# Altium PCB BUCK-BOOST_PWM_Controller.PcbDoc (part 1 of 2)
Units mil, origin at the board's own origin, x right, y up, seen from the top; angles counter-clockwise.
Board outline 3547.43 x 2765.94 mil, 2 copper layers (Top Layer, Bottom Layer); 199 components, 100 nets, 475 pads, 71 vias.
Unrouted connection lines stored in the file: 456.
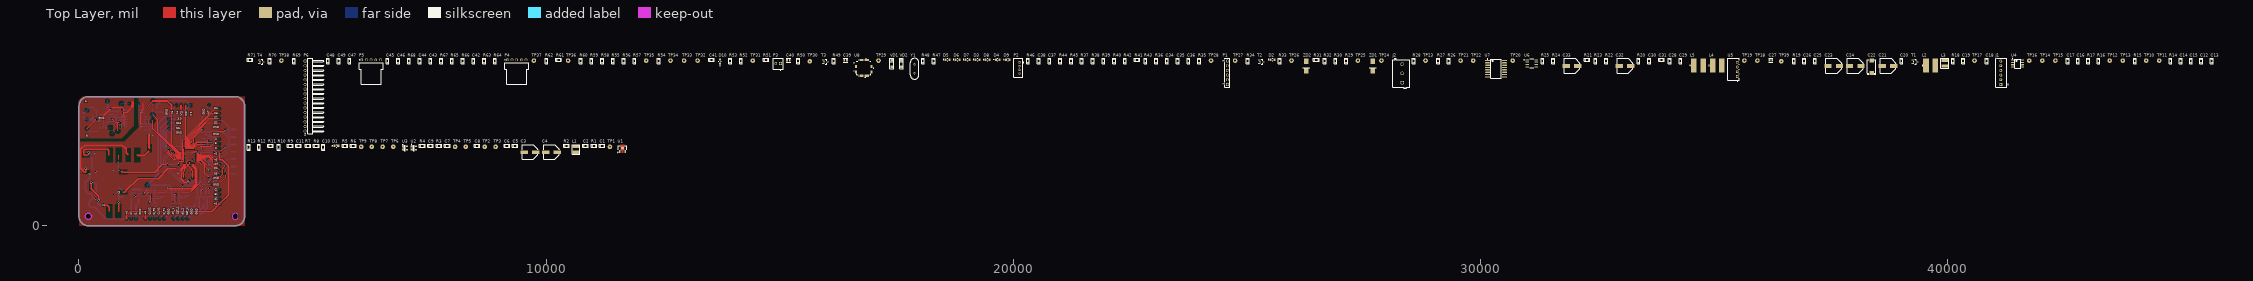
[diagram p0: Top Layer view]
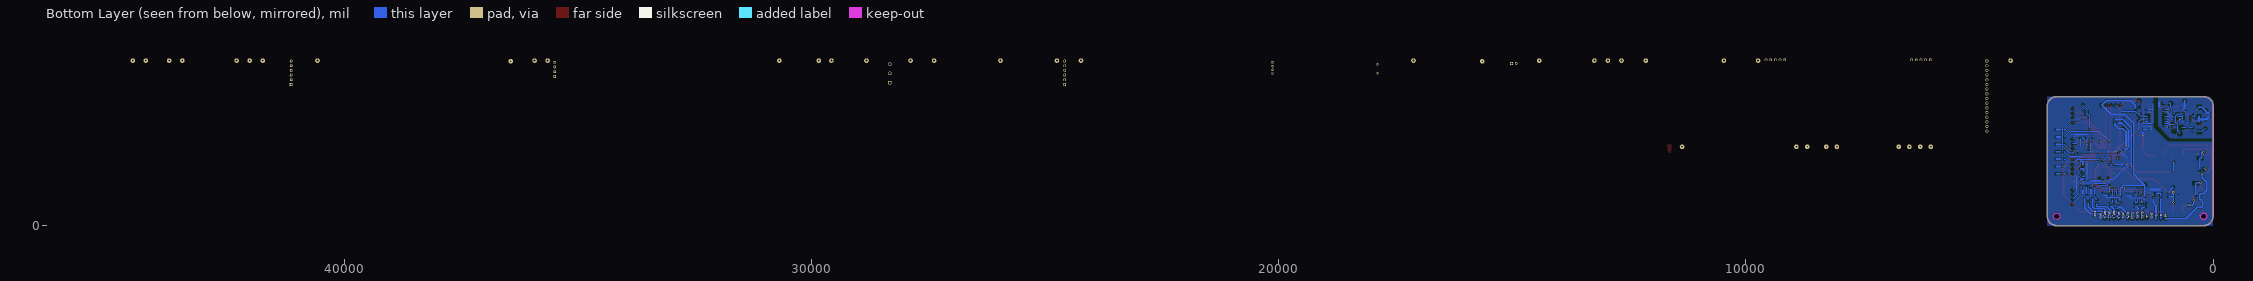
[diagram p1: Bottom Layer view, seen from below]

## Layer stack, top to bottom
Top Solder: solder mask 0.4, Solder Resist, Dk 3.5
Top Layer: signal copper 1.4
Dielectric 1: dielectric 12.6, FR-4, Dk 4.8
Bottom Layer: signal copper 1.4
Bottom Solder: solder mask 0.4, Solder Resist, Dk 3.5

## Board outline
0.89,202.76 0.89,2564.86 0.89,2570.87 1.01,2571.96 cw(c202.76,2564.96) 202.76,2766.83 3346.46,2766.83 3346.51,2766.83 cw(c3346.46,2564.96) 3548.2,2571.97 3548.32,2570.87 3548.32,202.76 cw(c3346.46,202.76) 3346.5,0.89 3346.46,0.89 202.76,0.89 202.68,0.89 cw(c202.76,202.76)
cut-out: 3278.86,202.76 ccw(c3346.46,202.76) 3346.46,135.16 ccw(c3346.46,202.76) 3414.06,202.76 ccw(c3346.46,202.76) 3346.46,270.35 ccw(c3346.46,202.76)
cut-out: 202.76,135.16 cw(c202.76,202.76) 135.16,202.76 cw(c202.76,202.76) 202.76,270.35 cw(c202.76,202.76) 270.35,202.76 cw(c202.76,202.76)

## Design rules (kind name [scope] priority, off if disabled: settings)
Clearance [All] p1: gap=5.91 ignorepadtopadclearanceinfootprint=FALSE except(0: Via-Hole Fill-Hole Poly-Hole Region-Hole Text-Hole; 7.87: THPad-THPad THPad-Via THPad-Fill THPad-Poly THPad-Region THPad-Text THPad-Hole; 10: Via-Via Via-Fill Via-Poly Via-Region Via-Text Fill-Fill Fill-Poly Fill-Region Fill-Text Poly-Poly Poly-Region Poly-Text Region-Region Region-Text Text-Text)
DiffPairsRouting [All] p1: maxlimit=10 minlimit=7.87 mostfreqgap=10 toplayer_minwidth=15 toplayer_maxwidth=15 toplayer_prefwidth=15 bottomlayer_minwidth=15 bottomlayer_maxwidth=15 bottomlayer_prefwidth=15 maxuncoupledlength=500
PlaneClearance [All] p1: clearance=25
PlaneConnect [InNet('GND_2')] p1: planeconnectstyle=Direct reliefexpansion=20 reliefentries=4 reliefconductorwidth=10 reliefairgap=10
PolygonConnect [InNet('GND_III') vs InNet('GND_III')] p1: connectstyle=Direct reliefconductorwidth=10 reliefentries=4 polygonreliefangle="90 Angle" airgapwidth=10
RoutingVias [All] p1: holewidth=28 width=50 viastyle="Through Hole" minholewidth=28 minwidth=50 maxholewidth=28 maxwidth=50
SolderMaskExpansion [All] p1: expansion=4 istentingtop=FALSE
SupplyNets "Schematic Supply Nets_10" [InNet('GND_III')] p1: voltage=0.000
SupplyNets "Schematic Supply Nets_9" [InNet('+3V3_MCU')] p2: voltage=0.000
SupplyNets "Schematic Supply Nets_8" [InNet('+5V_ISO')] p3: voltage=0.000
SupplyNets "Schematic Supply Nets_7" [InNet('+5VDC')] p4: voltage=0.000
SupplyNets "Schematic Supply Nets_6" [InNet('+3V3_REF')] p5: voltage=0.000
SupplyNets "Schematic Supply Nets_5" [InNet('+5V_OUT')] p6: voltage=0.000
SupplyNets "Schematic Supply Nets_3" [InNet('GND_2')] p7: voltage=0.000
SupplyNets "Schematic Supply Nets_2" [InNet('+5V')] p8: voltage=0.000
SupplyNets "Schematic Supply Nets_1" [InNet('+3V3')] p9: voltage=0.000
SupplyNets "Schematic Supply Nets" [InNet('+5')] p10: voltage=0.000
Width [All] p1: maxlimit=196.85 minlimit=7.87 preferedwidth=10
27 further rules are at their usual default settings.

## Components (designator, comment, footprint, x,y, rotation, side; value= is the part's Value field where it differs from the comment)
C1 "0.1uF" CAP-0805 11198.41,1712.73 r0 top
C2 "0.1uF" CAP-0805 10843.08,1712.73 r0 top
C3 "CAP-POLAR" CAP_SMD_Size_E 9653.06,1577.88 r0 top
C4 "CAP-POLAR" CAP_SMD_Size_E 10113.71,1577.88 r0 top
C5 "0.1uF" CAP-0805 9336.11,1712.73 r0 top
C6 "0.1uF" CAP-0805 9157.96,1712.73 r0 top
C7 "0.1uF" CAP-0805 7882.3,1712.73 r0 top
C8 "0.1uF" CAP-0805 8520.13,1712.73 r0 top
C9 "0.1uF" CAP-0805 7526.97,1712.73 r0 top
C10 "0.1uF" CAP-0805 5228.63,1682.22 r90 top
C11 "0.1uF" CAP-0805 4702.03,1712.73 r0 top
C12 "1000pF" CAP-0805 45424.49,3526.8 r90 top
C13 "1000pF" CAP-0805 45644.97,3526.8 r90 top
C14 "1000pF" CAP-0805 44983.52,3526.8 r90 top
C15 "1000pF" CAP-0805 45204.01,3526.8 r90 top
C16 "0.1uF" CAP-0805 42782.63,3526.8 r90 top
C17 "0.1uF" CAP-0805 42562.15,3526.8 r90 top
C18 "0.1uF" CAP-0805 40830.76,3526.8 r90 top
C19 "0.1uF" CAP-0805 40330.74,3526.8 r90 top
C20 "0.1uF" CAP-0805 39005.87,3526.8 r90 top
C21 "CAP-POLAR" CAP_SMD_Size_E 38714.52,3422.46 r0 top
C22 "CAP-POLAR" CAP-TAN-D 38367.06,3406.71 r90 top
C23 "CAP-POLAR" CAP_SMD_Size_E 37555.01,3422.46 r0 top
C24 "CAP-POLAR" CAP_SMD_Size_E 38015.66,3422.46 r0 top
C25 "0.1uF" CAP-0805 37155.39,3526.8 r90 top
C26 "0.1uF" CAP-0805 36925.06,3526.8 r90 top
C27 "C0805C224K5RACTU" FP-C0805C-DN-MFG 36210.46,3543.53 r0 top value="0.22 μF"
C28 "0.1uF" CAP-0805 34047.95,3526.8 r90 top
C29 "0.1uF" CAP-0805 34278.28,3526.8 r90 top
C30 "0.1uF" CAP-0805 33607.97,3526.8 r90 top
C31 "0.1uF" CAP-0805 33867.82,3556.32 r0 top
C32 "CAP-POLAR" CAP_SMD_Size_E 33085.31,3422.46 r0 top
C33 "CAP-POLAR" CAP_SMD_Size_E 31954.34,3422.46 r0 top
C34 "0.1uF" CAP-0805 23288.57,3526.8 r90 top
C35 "0.1uF" CAP-0805 23518.89,3526.8 r90 top
C36 "0.1uF" CAP-0805 23749.22,3526.8 r90 top
C37 "0.1uF" CAP-0805 20774.67,3526.8 r90 top
C38 "0.1uF" CAP-0805 20544.34,3526.8 r90 top
C39 "16pF" FP-GRM21B-0_1-IPC_C 16407.33,3543.53 r0 top
C40 "16pF" FP-GRM21B-0_1-IPC_C 15185.81,3543.53 r0 top
C41 "0.1uF" CAP-0805 13541.04,3556.32 r0 top
C42 "220pF" CAP-0805 8446.31,3526.8 r90 top
C43 "220pF" CAP-0805 7524.02,3526.8 r90 top
C44 "22pF" CAP-0805 7293.69,3526.8 r90 top
C45 "22pF" CAP-0805 6602.71,3526.8 r90 top
C46 "22pF" CAP-0805 6833.04,3526.8 r90 top
C47 "330pF" CAP-0805 5791.65,3526.8 r90 top
C48 "330pF" CAP-0805 5331,3526.8 r90 top
C49 "330pF" CAP-0805 5561.32,3526.8 r90 top
D1 "151031YS06000" LED_GREEN 5509.16,1711.75 r0 top
D2 "LED" LED_BLUE 25547.54,3555.34 r0 top
D3 "151031YS06000" LED_BLUE 19233.25,3555.34 r0 top
D4 "151031YS06000" LED_BLUE 19664.37,3555.34 r0 top
D5 "151031YS06000" LED_RED 18587.55,3555.34 r0 top
D6 "151031YS06000" LED_YELLOW 18803.11,3555.34 r0 top
D7 "151031YS06000" LED_GREEN 19017.69,3555.34 r0 top
D8 "151031YS06000" LED_BLUE 19448.81,3555.34 r0 top
D9 "151031YS06000" LED_BLUE 19879.94,3555.34 r0 top
D10 "151031YS06000" LED_RED 13722.16,3519.91 r90 top
J1 "SWR25X-NRTC-S06-ST-BA" Sullins_SWR25X-NRTC-S06-ST-BA_MFG 41144.75,3275.8 r90 top
J2 "" 691101710003 28300.62,3263 r90 top
L1 "Coil" NR4030 10639.33,1634.97 r0 top
L2 "1000µH, 0.3A" WE-PD2_7850 39629.92,3433.29 r0 top
L3 "Coil" NR4030 39936.03,3479.55 r0 top
L4 "1000µH, 0.3A" WE-PD2_7850 35062.76,3433.29 r0 top
L5 "1000µH, 0.3A" WE-PD2_7850 34661.17,3433.29 r0 top
P1 "61300611121" 61300611121 24578.98,3275.8 r90 top
P2 "62000411622" 62000411622 20106.33,3379.15 r90 top
P3 "61900211121" 61900211121 14964.34,3464.78 r0 top
P4 "61900511021" 61900511021 9368.6,3259.07 r0 top
P5 "61900511021" 61900511021 6253.29,3259.07 r0 top
P6 "61301611021" 61301611021 4952.04,2775.77 r90 top
R1 "220" RES-0805 11021.24,1712.73 r0 top
R2 "470" RES-0805 10434.59,1712.73 r0 top
R3 "10K" RES-0805 7705.13,1712.73 r0 top
R4 "10K" RES-0805 7348.81,1712.73 r0 top
R5 "10K" RES-0805 5694.2,1712.73 r0 top
R6 "10K" RES-0805 5872.36,1712.73 r0 top
R7 "10K" RES-0805 4902.83,1712.73 r0 top
R8 "10K" RES-0805 5080,1712.73 r0 top
R9 "10K" RES-0805 4523.87,1712.73 r0 top
R10 "10K" RES-0805 4273.86,1682.22 r90 top
R11 "1K" RES-0805 4103.58,1712.73 r0 top
R12 "100K*" RES-0805 3853.56,1682.22 r90 top
R13 "100K*" RES-0805 3633.08,1682.22 r90 top
R14 "10K" RES-0805 44763.04,3526.8 r90 top
R15 "10K" RES-0805 44003.16,3526.8 r90 top
R16 "10K" RES-0805 43222.61,3526.8 r90 top
R17 "10K" RES-0805 43002.13,3526.8 r90 top
R18 "1K" RES-0805 40110.25,3526.8 r90 top
R19 "10K" RES-0805 36704.58,3526.8 r90 top
R20 "10K" RES-0805 33377.64,3526.8 r90 top
R21 "10K" RES-0805 32275.23,3556.32 r0 top
R22 "10K" RES-0805 32686.66,3526.8 r90 top
R23 "10K" RES-0805 32456.34,3526.8 r90 top
R24 "10K" RES-0805 31554.72,3526.8 r90 top
R25 "470" RES-0805 31324.39,3526.8 r90 top
R26 "100" RES-0805 29320.36,3526.8 r90 top
R27 "100" RES-0805 29090.03,3526.8 r90 top
R28 "1K" RES-0805 28570.32,3526.8 r90 top
R29 "10K" RES-0805 27123.4,3526.8 r90 top
R30 "220" RES-0805 26893.07,3526.8 r90 top
R31 "10K" RES-0805 26482.62,3556.32 r0 top
R32 "10K" RES-0805 26662.75,3526.8 r90 top
R33 "1K" RES-0805 25702.07,3526.8 r90 top
R34 "10K" RES-0805 25015.03,3526.8 r90 top
R35 "10K" RES-0805 23979.55,3526.8 r90 top
R36 "470" RES-0805 23058.24,3526.8 r90 top
R37 "220" RES-0805 21465.64,3526.8 r90 top
R38 "220" RES-0805 21695.97,3526.8 r90 top
R39 "220" RES-0805 21926.3,3526.8 r90 top
R40 "220" RES-0805 22156.62,3526.8 r90 top
R41 "220" RES-0805 22647.79,3556.32 r0 top
R42 "220" RES-0805 22386.95,3526.8 r90 top
R43 "220" RES-0805 22827.91,3526.8 r90 top
R44 "10K" RES-0805 21004.99,3526.8 r90 top
R45 "10K" RES-0805 21235.32,3526.8 r90 top
R46 "1K" RES-0805 20314.01,3526.8 r90 top
R47 "10E" RES-0805 18296.2,3526.8 r90 top
R48 "10E" RES-0805 18065.87,3526.8 r90 top
R49 "1K" RES-0805 16155.35,3526.8 r90 top
R50 "10K" RES-0805 15393.5,3526.8 r90 top
R51 "1K" RES-0805 14702.52,3556.32 r0 top
R52 "10K" RES-0805 14171.98,3526.8 r90 top
R53 "100" RES-0805 13941.65,3526.8 r90 top
R54 "10K" RES-0805 12411.07,3526.8 r90 top
R55 "220K" RES-0805 11429.72,3526.8 r90 top
R56 "220K" RES-0805 11660.05,3526.8 r90 top
R57 "220K" RES-0805 11890.37,3526.8 r90 top
R58 "100" RES-0805 11199.39,3526.8 r90 top
R59 "20K" RES-0805 10969.07,3526.8 r90 top
R60 "10K" RES-0805 10738.74,3526.8 r90 top
R61 "220" RES-0805 10268.25,3556.32 r0 top
R62 "100" RES-0805 10008.39,3526.8 r90 top
R63 "22K" RES-0805 8676.63,3526.8 r90 top
R64 "22K" RES-0805 8906.96,3526.8 r90 top
R65 "220K" RES-0805 7985.66,3526.8 r90 top
R66 "220K" RES-0805 8215.98,3526.8 r90 top
R67 "220K" RES-0805 7755.33,3526.8 r90 top
R68 "470" RES-0805 7063.37,3526.8 r90 top
R69 "1K" RES-0805 4604.58,3526.8 r90 top
R70 "1K" RES-0805 4084.87,3526.8 r90 top
R71 "10K" RES-0805 3662.61,3556.32 r0 top
T1 "BC847C" SOT23-3_IPC_A 39298.21,3510.06 r0 top
T2 "BC847C" SOT23-3_IPC_A 25307.37,3510.06 r0 top
T3 "BC847C" SOT23-3_IPC_A 15976.2,3510.06 r0 top
T4 "BC847C" SOT23-3_IPC_A 3904.75,3510.06 r0 top
TP1 "Test_Point_PCB" Test_Point 11365.74,1692.06 r0 top
TP2 "Test_Point_PCB" Test_Point 8688.45,1692.06 r0 top
TP3 "Test_Point_PCB" Test_Point 8917.79,1692.06 r0 top
TP4 "Test_Point_PCB" Test_Point 8050.62,1692.06 r0 top
TP5 "Test_Point_PCB" Test_Point 8279.96,1692.06 r0 top
TP6 "Test_Point_PCB" Test_Point 6729.69,1692.06 r0 top
TP7 "Test_Point_PCB" Test_Point 6499.36,1692.06 r0 top
TP8 "Test_Point_PCB" Test_Point 6269.04,1692.06 r0 top
TP9 "Test_Point_PCB" Test_Point 6039.69,1692.06 r0 top
TP10 "Test_Point_PCB" Test_Point 44243.33,3536.64 r90 top
TP11 "Test_Point_PCB" Test_Point 44522.87,3536.64 r90 top
TP12 "Test_Point_PCB" Test_Point 43462.78,3536.64 r90 top
TP13 "Test_Point_PCB" Test_Point 43743.31,3536.64 r90 top
TP14 "Test_Point_PCB" Test_Point 42021.76,3536.64 r90 top
TP15 "Test_Point_PCB" Test_Point 42301.31,3536.64 r90 top
TP16 "Test_Point_PCB" Test_Point 41741.24,3536.64 r90 top
TP17 "Test_Point_PCB" Test_Point 40569.92,3536.64 r90 top
TP18 "Test_Point_PCB" Test_Point 35924.03,3536.64 r90 top
TP19 "" Test_Point 35644.49,3536.64 r90 top
TP20 "Test_Point_PCB" Test_Point 30686.57,3536.64 r90 top
TP21 "Test_Point_PCB" Test_Point 29570.37,3536.64 r90 top
TP22 "Test_Point_PCB" Test_Point 29841.05,3536.64 r90 top
TP23 "Test_Point_PCB" Test_Point 28820.33,3536.64 r90 top
TP24 "Test_Point_PCB" Test_Point 27877.37,3536.64 r90 top
TP25 "" Test_Point 27373.41,3536.64 r90 top
TP26 "Test_Point_PCB" Test_Point 25952.08,3536.64 r90 top
TP27 "Test_Point_PCB" Test_Point 24744.35,3536.64 r90 top
TP28 "Test_Point_PCB" Test_Point 24229.56,3536.64 r90 top
TP29 "Test_Point_PCB" Test_Point 17113.07,3536.64 r90 top
TP30 "Test_Point_PCB" Pin_Test_Point(Pink) 15643.51,3519.91 r0 top
TP31 "Test_Point_PCB" Test_Point 14421.99,3536.64 r90 top
TP32 "Test_Point_PCB" Test_Point 13240.83,3536.64 r90 top
TP33 "Test_Point_PCB" Test_Point 12951.45,3536.64 r90 top
TP34 "Test_Point_PCB" Test_Point 12661.08,3536.64 r90 top
TP35 "Test_Point_PCB" Test_Point 12140.39,3536.64 r90 top
TP36 "Test_Point_PCB" Test_Point 10469.04,3536.64 r90 top
TP37 "Test_Point_PCB" Test_Point 9737.71,3536.64 r90 top
TP38 "Test_Point_PCB" Test_Point 4333.9,3536.64 r90 top
TP39 "Test_Point_PCB" Pin_Test_Point(Orange) 36433.89,3519.91 r0 top
U1 "AMS1117" SOT-89 11634.46,1663.52 r0 top
U2 "" SOT-23-5 7165.73,1664.5 r0 top
U3 "" SOT-23-5 6975.76,1664.5 r0 top
U4 "LP2951ACM-3.3" D0008A_N 41491.23,3471.67 r0 top
U5 "B0505S-1W" B0505S-1W 35410.22,3348.64 r90 top
U6 "MAX485" SOIC-8-MFG 31096.03,3477.58 r0 top
U7 "ADUM1401BRWZ" ADI-RW-16_M 30330.25,3362.42 r0 top
U8 "STM32F303CCT6" LQFP48-7x7mm 16798.09,3380.13 r0 top
VD1 "SMF3.3A" SMF3.3A 17394.58,3475.61 r0 top
VD2 "SMF3.3A" SMF3.3A 17604.23,3475.61 r0 top
Y1 "FOXSLF/120-20" FOX-FOXSLF-2_V 17885.74,3361.43 r90 top
ZD1 "P6SMB16CA" DO-214AA 27693.31,3331.9 r90 top
ZD2 "P6SMB16CA" DO-214AA 26271,3331.9 r90 top

## Footprints (in the part's own frame and the unit in brackets; to place one, negate y for a bottom-side part, rotate by r counter-clockwise, add the part's x,y. Pads: shape width x height; smd on the part's side, far side on the other; paste and mask are expansions set on the pad)
61300611121 [mm] "Pin Header, pitch 2.54 mm, THT, Vertical, single row, 6p"
  rrect50% 1.6x1.6 hole 1.1: 1(-6.35,0)
  round 1.6 hole 1.1: 2(-3.81,0) 3(-1.27,0) 4(1.27,0) 5(3.81,0) 6(6.35,0)
  silkscreen extent -7.77,-1.35 7.77,1.35, body extent -7.62,-1.27 7.62,1.27, height 8.57
61301611021 [mm] "Pin Header, pitch 2.54 mm, THT, Angled, single row, 16p"
  rrect50% 1.65x1.65 hole 1.1: 1(19.05,2.77)
  round 1.65 hole 1.1: 2(16.51,2.77) 3(13.97,2.77) 4(11.43,2.77) 5(8.89,2.77) 6(6.35,2.77) 7(3.81,2.77) 8(1.27,2.77) 9(-1.27,2.77) 10(-3.81,2.77) 11(-6.35,2.77) 12(-8.89,2.77) 13(-11.43,2.77) 14(-13.97,2.77) 15(-16.51,2.77) 16(-19.05,2.77)
  silkscreen extent -20.47,-7.27 20.47,1.35, body extent -20.32,-7.27 20.32,3.09, height 2.58
61900211121 [mm] "2.54mm Male Locking Header, 2p"
  rect 1.5x1.5 hole 1: 1(1.27,0.3)
  round 1.5 hole 1: 2(-1.27,0.3)
  silkscreen extent -2.71,-3.52 2.71,2.98, body extent -2.54,-2.9 2.54,2.9, height 11.53
61900511021 [mm] "2.54mm Male Left Angled Header Bottom Locking, 5p"
  rect 1.5x1.5 hole 1: 1(-5.08,7.45)
  round 1.5 hole 1: 2(-2.54,7.45) 3(0,7.45) 4(2.54,7.45) 5(5.08,7.45)
  silkscreen extent -6.53,-5.82 6.52,7.62, body extent -6.35,-5.75 6.35,7.77, height 5.83
62000411622 [mm] "2.00mm Male Vertical Shrouded Header, 4p"
  rect 1.3x1.3 hole 0.8: 1(3,-0.6)
  round 1.3 hole 0.8: 2(1,-0.6) 3(-1,-0.6) 4(-3,-0.6)
  silkscreen extent -5.15,-3.03 5.15,2.45, body extent -5,-2.35 5,2.35, height 6.13
691101710003 [mm] "5,00mm - modular - blue - Horizontal entry with pressure clamp - 12,6mm height - 03p"
  rrect50% 1.95x1.95 hole 1.3: 1(-5,-0.5)
  round 1.95 hole 1.3: 2(0,-0.5) 3(5,-0.5)
  silkscreen extent -8.1,-4.5 8.1,4.5, body extent -8.1,-4.5 8.1,4.5, height 12.65
ADI-RW-16_M [mm] "SOIC, 16-Leads, Body 10.3x7.5mm, Pitch 1.27mm, IPC Low Density"
  oval 2.6x0.7 smd: 1(-4.625,4.445) 2(-4.625,3.175) 3(-4.625,1.905) 4(-4.625,0.635) 5(-4.625,-0.635) 6(-4.625,-1.905) 7(-4.625,-3.175) 8(-4.625,-4.445) 9(4.625,-4.445) 10(4.625,-3.175) 11(4.625,-1.905) 12(4.625,-0.635) 13(4.625,0.635) 14(4.625,1.905) 15(4.625,3.175) 16(4.625,4.445)
  silkscreen extent -4.75,-5.25 2.93,5.47, body extent -3.8,-5.25 3.8,5.25, height 2.65
B0505S-1W [mm]
  rect 1.55x1.55 hole 1 paste-2539.97 mask+0: 1(-3.81,-2.1)
  round 1.55 hole 1 paste-2539.97 mask+0: 2(-1.27,-2.1) 3(1.27,-2.1) 4(3.81,-2.1)
  silkscreen extent -6.52,-3.13 5.92,3.13, body extent -6.02,-3.22 6.02,3.22, height 0.25
CAP-0805 [mm]
  rect 0.8x1.25 smd mask+0.015: 1(-1,0) 2(1,0)
  silkscreen extent -1.52,-0.76 1.52,0.76, body extent -1,-0.62 1,0.63, height 0.8
CAP-TAN-D [mm]
  rect 2.2x2.5 smd: 1(-3.45,0) 2(3.45,0)
  silkscreen extent -4.5,-2.4 3.65,2.4, body extent -3.8,-2.3 3.8,2.3, height 4
CAP_SMD_Size_E [mm]
  rect 4x2 smd: 1(3.175,0) 2(-3.048,0)
  silkscreen extent -4.19,-3.94 4.32,4.06, body extent -4.25,-4 4.25,4, height 10.59
D0008A_N [mm] "SOIC, 8-Leads, Body 5x4mm, Pitch 1.27mm, IPC Medium Density"
  rrect17% 1.45x0.6 smd: 1(-2.725,1.905) 2(-2.725,0.635) 3(-2.725,-0.635) 4(-2.725,-1.905) 5(2.725,-1.905) 6(2.725,-0.635) 7(2.725,0.635) 8(2.725,1.905)
  silkscreen extent -2.85,-2.5 1.6,2.88, body extent -3,-2.45 3,2.45, height 1.63
DO-214AA [mm]
  rect 3x2.4 smd: 1(-0.381,0) 2(4.953,0)
  silkscreen extent 1.27,-1.91 1.27,1.91, body extent -0.53,-1.85 5.07,2.1, height 2.65
FOX-FOXSLF-2_V [mm] "THD, 2-Leads, Body 11.35x4.65mm, Pitch 4.88mm"
  round 1.2 hole 0.7: 1(-2.44,0) 2(2.44,0)
  silkscreen extent -5.68,-2.32 5.68,2.32, body extent -5.67,-2.32 5.68,2.32, height 3.6
FP-C0805C-DN-MFG [mm]
  rect 0.95x1.35 smd paste+0 mask+0: 1(-0.75,0) 2(0.75,0)
  silkscreen extent -1.1,-1.07 1.1,1.07, body extent -1.4,-0.85 1.4,0.85, height 0.25
FP-GRM21B-0_1-IPC_C [mil]
  rect 37.71x49.69 smd paste+0 mask+0: 1(-28.63,0) 2(28.63,0)
  silkscreen extent -47,-42 47,42, body extent -51,-31 51,31, height 10
LED_BLUE [mm]
  rect 1.1x1.2 smd paste+0 mask+0: 1(-1.05,0) 2(1.05,0)
  silkscreen extent -2.27,-0.67 0.13,0.67, body extent -1,-0.63 1,0.63, height 0.8
LED_GREEN [mm]
  rect 1.1x1.2 smd paste+0 mask+0: 1(-1.05,0) 2(1.05,0)
  silkscreen extent -2.27,-0.67 0.13,0.67, body extent -1,-0.63 1,0.63, height 0.8
LED_RED [mm]
  rect 1.1x1.2 smd paste+0 mask+0: 1(-1.05,0) 2(1.05,0)
  silkscreen extent -2.27,-0.67 0.13,0.67, body extent -1.7,-0.77 1.7,0.77, height 0.25
LED_YELLOW [mm]
  rect 1.1x1.2 smd paste+0 mask+0: 1(-1.05,0) 2(1.05,0)
  silkscreen extent -2.27,-0.67 0.13,0.67, body extent -1,-0.63 1,0.63, height 0.8
LQFP48-7x7mm [mil]
  rect 47x12 smd paste+0 mask+0: 1(-167.32,108.27) 2(-167.32,88.58) 3(-167.32,68.9) 4(-167.32,49.21) 5(-167.32,29.53) 6(-167.32,9.84) 7(-167.32,-9.84) 8(-167.32,-29.53) 9(-167.32,-49.21) 10(-167.32,-68.9) 11(-167.32,-88.58) 12(-167.32,-108.27) 25(167.32,-108.27) 26(167.32,-88.58) 27(167.32,-68.9) 28(167.32,-49.21) 29(167.32,-29.53) 30(167.32,-9.84) 31(167.32,9.84) 32(167.32,29.53) 33(167.32,49.21) 34(167.32,68.9) 35(167.32,88.58) 36(167.32,108.27)
  rect 12x47 smd paste+0 mask+0: 13(-108.27,-167.32) 14(-88.58,-167.32) 15(-68.9,-167.32) 16(-49.21,-167.32) 17(-29.53,-167.32) 18(-9.84,-167.32) 19(9.84,-167.32) 20(29.53,-167.32) 21(49.21,-167.32) 22(68.9,-167.32) 23(88.58,-167.32) 24(108.27,-167.32) 37(108.27,167.32) 38(88.58,167.32) 39(68.9,167.32) 40(49.21,167.32) 41(29.53,167.32) 42(9.84,167.32) 43(-9.84,167.32) 44(-29.53,167.32) 45(-49.21,167.32) 46(-68.9,167.32) 47(-88.58,167.32) 48(-108.27,167.32)
  silkscreen extent -214,-211 211,211, body extent -177,-177 177,177, height 63
NR4030 [mm]
  rect 3.8x1.7 smd: 1(0,1.524) 2(0,-1.524)
  silkscreen extent -2.16,-2.67 2.16,2.67, body extent -2,-2 2,2, height 3.15
Pin_Test_Point(Orange) [mm]
  round 2.5 hole 0.95: 1(0,0)
  body extent -1.3,-1.78 1.3,1.78, height 6.93
Pin_Test_Point(Pink) [mm]
  round 2.5 hole 0.95: 1(0,0)
  body extent -1.3,-1.78 1.3,1.78, height 6.93
RES-0805 [mm]
  rect 0.8x1.25 smd mask+0.015: 1(-1,0) 2(1,0)
  silkscreen extent -1.52,-0.76 1.52,0.76, body extent -1,-0.62 1,0.63, height 0.6
SMF3.3A [mil]
  rect 60x60 smd: 1(0,70) 2(0,-70)
  silkscreen extent -40,-110 40,110, body extent -39,-77 39,77, height 48
SOIC-8-MFG [mm]
  rect 1.98x0.53 smd paste+0 mask+0: 1(-2.465,1.905) 2(-2.465,0.635) 3(-2.465,-0.635) 4(-2.465,-1.905) 5(2.465,-1.905) 6(2.465,-0.635) 7(2.465,0.635) 8(2.465,1.905)
  silkscreen extent -4.27,-2.5 1.1,2.5, body extent -3.55,-2.75 3.55,2.75, height 0.25
SOT23-3_IPC_A [mm]
  rect 1.308x0.616 smd paste+0 mask+0: 1(-1.175,0.95)
  rrect100% 1.308x0.616 smd paste+0 mask+0: 2(-1.175,-0.95) 3(1.175,0)
  silkscreen extent -0.65,-1.45 0.65,1.45, body extent -2.33,-1.95 2.33,1.95, height 0.25
SOT-23-5 [mm]
  rect 0.9x0.65 smd: 1(-1.2,0.95) 2(-1.2,0) 3(-1.2,-0.95) 4(1.2,-0.95) 5(1.2,0.95)
  silkscreen extent -1.32,-1.55 0.35,1.95, body extent -1.4,-1.45 1.4,1.45, height 1.24
SOT-89 [mm]
  rect 0.58x1.73 smd paste+0 mask+0: 1(-1.5,-1.781) 3(1.5,-1.781)
  round 1.74 smd paste+0 mask+0: 2(0,0)
  Top Layer region: -0.38,-2.646 -0.38,-1.146 -0.967,-1.146 -0.967,1.884 0.967,1.884 0.967,-1.146 0.38,-1.146 0.38,-2.646
  silkscreen extent -2.7,-2.47 2.3,1.15, body extent -2.4,-2.75 2.4,1.98, height 0.25
Sullins_SWR25X-NRTC-S06-ST-BA_MFG [mm]
  rect 1.55x1.55 hole 1 paste-2539.97 mask+0: 1(-6.35,0.3)
  round 1.55 hole 1 paste-2539.97 mask+0: 2(-3.81,0.3) 3(-1.27,0.3) 4(1.27,0.3) 5(3.81,0.3) 6(6.35,0.3)
  silkscreen extent -7.8,-3.68 7.8,3.05, body extent -7.9,-3.15 7.9,3.15, height 0.25
Test_Point [mm]
  round 2.5 hole 0.95: 1(0,0)
WE-PD2_7850 [mm] "SMD Power Inductor, 2-Leads, body 7.8x7mm"
  rect 3x7.5 smd: 1(-2.5,0) 2(2.5,0)
  silkscreen extent -4.59,-0.12 -4.34,0.12, body extent -3.81,-3.5 3.81,3.5, height 4.95

## Part data
C1 C2 C5 C6 C7 C8 C9 C10 C11 C12 C13 C14 C15 C16 C17 C18 C19 C20 C25 C26 C28 C29 C30 C31 C34 C35 C36 C37 C38 C41 C42 C43 C44 C45 C46 C47 C48 C49: library part CAP-NON-POLAR
C27: library part CMP-1036-04552-2, "CAP CER 0.22UF 50V X7R 0805", Capacitance="0.22 μF", Manufacturer=KEMET, Package=C0805C-DN, Temperature="-55°C to +125°C", Temperature Characteristic=X7R, Temperature Coefficient=30ppm/°C, Temperature Range High=+125°C, Temperature Range Low=-55°C, Tolerance=0.1, Voltage Rating="50 V", Automotive=No, Category=Cap, ComponentLink2Description=Datasheet, ComponentLink2URL=https://content.kemet.com/datasheets/KEM_C1003_C0G_SMD.pdf, Device Class L1="Passive Components", Device Class L2=Capacitors, Device Class L3="Ceramic Capacitors", Digikey Description="CAP CER 0.22UF 50V X7R 0805", Height=0.88mm, Ipc Land Pattern Name=CAPC200125X78, Lead Free=Yes, Manufacturer Part Number=C0805C224K5RACTU, Material=Ceramic, Mouser Description="CAP CER 0.22UF 50V X7R 0805", Octopart=https://octopart.com/c0805c224k5ractu-kemet-144670, RoHS=TRUE
C39 C40: library part CMP-2007-03453-2, "Chip Multilayer Ceramic Capacitors for General Purpose, 0805, 16pF, X5R, 15%, 10%, 16V", Capacitance=10uF, Case Code (Imperial)=0805, Case Code (Metric)=2012, Dielectric=X5R, Max Operating Temperature=85°C, Min Operating Temperature=-55°C, Package Quantity=1, Tolerance=10%, Voltage=16V, Case/Package=0805, Depth=1.25mm, Height=1.25mm, Lead Free="Lead Free", Length=2mm, Material=Ceramic, Mount="Surface Mount", Packaging="Tape and Reel", Radiation Hardening=No, REACH SVHC="No SVHC", Termination=SMD/SMT, Thickness=0.053inch, Voltage Rating=16V, Voltage Rating (DC)=16V, Width=1.25mm
D1 D3 D4 D5 D6 D7 D8 D9 D10: library part LED, "WURTH ELEKTRONIK - 151031YS06000 - LED, Yellow, Through Hole, T-1 (3mm), 30 mA, 2 V, 590 nm", Manufacturer_Name="Wurth Elektronik", Mouser Part Number=710-151031YS06000, Datasheet Link=https://katalog.we-online.de/led/datasheet/151031YS06000.pdf, Geometry.Height=5.5mm, Manufacturer_Part_Number=151031YS06000, Mouser Price/Stock=https://www.mouser.co.uk/ProductDetail/Wurth-Elektronik/151031YS06000?qs=LlUlMxKIyB3xSYYW%252BcuBiQ%3D%3D
D2: "WURTH ELEKTRONIK - 151031YS06000 - LED, Yellow, Through Hole, T-1 (3mm), 30 mA, 2 V, 590 nm", Manufacturer_Name="Wurth Elektronik", Manufacturer_Part_Number=151031YS06000, Mouser Part Number=710-151031YS06000, Datasheet Link=https://katalog.we-online.de/led/datasheet/151031YS06000.pdf, Geometry.Height=5.5mm, Mouser Price/Stock=https://www.mouser.co.uk/ProductDetail/Wurth-Elektronik/151031YS06000?qs=LlUlMxKIyB3xSYYW%252BcuBiQ%3D%3D
J2: library part 691101710003, "WR-TBL Series 101 Horizontal Entry Modular, Through Hole, pitch 5mm, 3p", Manufacturer="Wurth Elektronik", Operating Temperature Max=105°C, Operating Temperature Min=-40°C, Rated Current=16A, Working Voltage=250V, Application="Pressure Clamp", Category="Terminal Blocks", ComponentLink1Description="Manufacturer Link", ComponentLink1URL=https://www.we-online.com/redexpert/article/691101710003?ad, ComponentLink2Description=Datasheet, ComponentLink2URL=https://www.we-online.com/redexpert/spec/691101710003?ad, Manufacturer Part Number=691101710003, Match Code=WR-TBL, Modularity=Yes, Mount="Through Hole", Orientation=Horizontal, Packaging=Box, PCB/Cable/Panel=PCB, Pin Number=3, Pitch=5mm
L2 L4 L5: library part 74477530, "WE-PD2 SMT Power Inductor, size 7850, 1000µH, 0.3A, 3.3Ω", Case/Size Code=7850, DC Resistance=2.78Ω, DC Resistance Max=3.3Ω, Inductance=1000µH, Manufacturer="Wurth Elektronik", Operating Temperature Max=125°C, Operating Temperature Min=-40°C, Rated Current=0.3A, Self Resonant Frequency=2.4MHz, Category="Unshielded Power Inductors", ComponentLink1Description="Website Link", ComponentLink1URL=https://www.we-online.com/redexpert/article/74477530?ad, ComponentLink2Description="Datasheet Link", ComponentLink2URL=https://www.we-online.com/redexpert/spec/74477530?ad, Height=4.95mm, Length=7.8mm, Manufacturer Part Number=74477530, Match Code=WE-PD2, Mount="Surface Mount", Packaging="Tape and Reel", Saturation Current=0.3A, Width=7mm, Simulation ModelName=7850_74477530_1m, Simulation ModelText=".subckt 7850_74477530_1m 1 2 / Rp 1 2 187304.915771 / Cp 1 2 4.36976277949p / Rs 1 N3 3.3 / L1 N3 2 1000u / .ends 7850_74477530_1m", Simulation PortMap=(1:1),(2:2)
P1: "WR-PHD Pin Header, THT, Vertical, pitch 2.54mm, 1 Row, 6P", Contact Resistance=20mΩ, Manufacturer="Wurth Elektronik", Operating Temperature Max=105°C, Operating Temperature Min=-40°C, Rated Current=3A, Withstanding Voltage=500V, Working Voltage=250V, Category="Board-to-Board Connectors", ComponentLink1Description="Website Link", ComponentLink1URL=https://www.we-online.com/redexpert/article/61300611121?ad, ComponentLink2Description="Datasheet Link", ComponentLink2URL=https://www.we-online.com/redexpert/spec/61300611121?ad, Gender="Pin Header", Manufacturer Part Number=61300611121, Match Code=WR-PHD, Mount="Through Hole", Number of Pins=6, Number of Rows=1, Orientation=Vertical, Packaging=Bag, Pitch=2.54mm
P2: "WR-WTB Male Vertical Shrouded Header, pitch 2mm, 4p", Contact Resistance=20mOhm, Operating Temperature="-25 to +85degC", Rated Current=2A, Withstanding Voltage=800VAC, Working Voltage=125VAC, ComponentLink1Description=Manufacturer, ComponentLink1URL=http://www.we-online.de, ComponentLink2Description=Datasheet, ComponentLink2URL=https://www.we-online.com/catalog/datasheet/62000411622.pdf, Gender=Male, Mounting Technology=THT, Packaging=Bag, Part Number=62000411622, Pin Number=4, Pitch=2mm, Published Date="January 2020", Publisher="Wurth Elektronik", Type=Vertical
P3: "WR-WTB THT Male Vertical Locking Header, pitch 2.54mm, 2p", Contact Resistance=20mOhm, Operating Temperature="-40 to +105degC", Rated Current=3A, Withstanding Voltage=1000VAC, Working Voltage=250VAC, ComponentLink1Description=Manufacturer, ComponentLink1URL=http://www.we-online.de, ComponentLink2Description=Datasheet, ComponentLink2URL=https://www.we-online.com/catalog/datasheet/61900211121.pdf, Gender=Male, Mounting Technology=THT, Packaging=Bag, Part Number=61900211121, Pin Number=2, Pitch=2.54mm, Published Date="January 2020", Publisher="Wurth Elektronik", Type=Vertical
P4 P5: "WR-WTB THT Male Left Angled Bottom Locking Header, pitch 2.54mm, 5p", Contact Resistance=20mOhm, Operating Temperature="-40 to +105degC", Rated Current=3A, Withstanding Voltage=1000VAC, Working Voltage=250VAC, ComponentLink1Description=Manufacturer, ComponentLink1URL=http://www.we-online.de, ComponentLink2Description=Datasheet, ComponentLink2URL=https://www.we-online.com/catalog/datasheet/61900511021.pdf, Gender=Male, Mounting Technology=THT, Packaging=Bag, Part Number=61900511021, Pin Number=5, Pitch=2.54mm, Published Date="January 2020", Publisher="Wurth Elektronik", Type="Right Angled Bottom Locking"
P6: "WR-PHD Pin Header, THT, Angled, pitch 2.54mm, 1 Row, 16P", Contact Resistance=20mΩ, Manufacturer="Wurth Elektronik", Operating Temperature Max=105°C, Operating Temperature Min=-40°C, Rated Current=3A, Withstanding Voltage=500V, Working Voltage=250V, Category="Board-to-Board Connectors", ComponentLink1Description="Website Link", ComponentLink1URL=https://www.we-online.com/redexpert/article/61301611021?ad, ComponentLink2Description="Datasheet Link", ComponentLink2URL=https://www.we-online.com/redexpert/spec/61301611021?ad, Gender="Pin Header", Manufacturer Part Number=61301611021, Match Code=WR-PHD, Mount="Through Hole", Number of Pins=16, Number of Rows=1, Orientation=Angled, Packaging=Bag, Pitch=2.54mm
R1 R2 R3 R4 R5 R6 R7 R8 R9 R10 R11 R12 R13 R14 R15 R16 R17 R18 R19 R20 R21 R22 R23 R24 R25 R26 R27 R28 R29 R30 R31 R32 R33 R34 R35 R36 R37 R38 R39 R40 R41 R42 R43 R44 R45 R46 R47 R48 R49 R50 R51 R52 R53 R54 R55 R56 R57 R58 R59 R60 R61 R62 R63 R64 R65 R66 R67 R68 R69 R70 R71: library part RES-CONST
TP1 TP2 TP3 TP4 TP5 TP6 TP7 TP8 TP9 TP10 TP11 TP12 TP13 TP14 TP15 TP16 TP17 TP18 TP19 TP20 TP21 TP22 TP23 TP24 TP25 TP26 TP27 TP28 TP29 TP30 TP31 TP32 TP33 TP34 TP35 TP36 TP37 TP38 TP39: library part TP_PCB?, "Test_Point"
U2 U3: library part MCP6001T, "IC OPAMP GP 1 CIRCUIT SOT23-5", Case/Package=SOT-23, Input Bias Current=1pA, Input Offset Voltage (Vos)=4.5mV, Max Operating Temperature=85°C, Max Supply Voltage=6V, Min Operating Temperature=-40°C, Min Supply Voltage=1.8V, Nominal Supply Current=100uA, Operating Supply Voltage=5.5V, Output Current=23mA, Package Quantity=1, Power Supply Rejection Ratio (PSRR)=86dB, Voltage Gain=112dB, Bandwidth=1MHz, Common Mode Rejection Ratio=60dB, Contact Plating=Tin, Gain Bandwidth Product=1MHz, Height=1.3mm, Lead Free="Lead Free", Length=3.1mm, Mount="Surface Mount", Number of Amplifiers=1, Number of Channels=1, Number of Circuits=1, Number of Elements=1, Number of Pins=5, Operating Supply Current=100uA, Output Current per Channel=23mA, Packaging="Tape and Reel", Radiation Hardening=No, REACH SVHC="No SVHC", Slew Rate=0.6V/µs, Unity Gain Bandwidth Product=1MHz, Voltage=6V, Width=1.8mm
U4: library part CMP-0062-01032-3, "Series of Adjustable Micropower Voltage Regulators, 8-pin Narrow SOIC", Manufacturer="Texas Instruments", PackageTopMarking=NSZXTT*2951A*CM33DD, PowerWise=N, Code_IPC=SOIC127P600-8, Code_JEDEC=MS-012-AA, ComponentLink1Description="Datasheet URL", ComponentLink1URL=http://www.ti.com/general/docs/lit/getliterature.tsp?genericPartNumber=LP2951-N&fileType=pdf, CompType="LDO IC", PackageDescription="SOIC Narrow, 4.9 x 3.9 x 1.45mm, 8 Lead, 1.27mm Pitch", PackageReference=D0008A, PinCount=8, RoHS=N
U7: library part CMP-0534-00565-1, "Quad Channel Digital Isolator, 2.5 KV rms Insulation Rating, 10 Mbps Data Rate, 50 ns Delay, Industrial, 16-pin SOIC (RW-16), Tube", Manufacturer="Analog Devices", Max Operating Temp (degreesC)=125, Code_JEDEC=MS-013-AA, ComponentLink1Description="Manufacturer URL", ComponentLink1URL=http://www.analog.com/en/index.html, ComponentLink2Description=Datasheet, ComponentLink2URL=http://www.analog.com/static/imported-files/data_sheets/ADuM1400_1401_1402.pdf, ComponentLink3Description="Package Specification", ComponentLink3URL=http://www.analog.com/static/imported-files/packages/PKG_PDF/SOIC_WIDE%20%28RW%29/RW_16.pdf, ComponentLink4Description="URL Link1", ComponentLink4URL="Product URL:http://www.analog.com/en/interface-isolation/digital-isolators/adum1401/products/product.html", ComponentLink5Description="URL Link2", ComponentLink5URL="Reference Circuit:http://www.analog.com/en/interface-isolation/digital-isolators/adum1401/products/product.html#product-recommendations", DatasheetVersion="Rev. H", Max Data Rate=10Mbps, Mounting Technology="Surface Mount", PackageDescription="16-Pin Standard Small Outline Package, Body 10.3 x 7.5 mm, Pitch 1.27 mm", PackageReference=RW-16, PackageVersion="032707-B, 03/2007", PartNumber=ADUM1401BRWZ
U8: "No Description Available", Mfr_Name=STMicroelectronics, RefDes=RefDes, Type=Type
VD1 VD2: library part ESD_Unidirect
Y1: library part CMP-1749-00004-1, "Resistance Weld Thru-Hole Crystal, 12 MHz, +/-30 ppm, -20 to 70 degC, 2-Pin THD, RoHS, Bulk", Case\Package=TO-251-3, Input Capacitance="350 pF", Max Operating Temperature="150 degC", Max Power Dissipation="2.5 W", Min Operating Temperature="-55 degC", Package Quantity=70, ComponentLink1Description="Manufacturer URL", ComponentLink1URL=http://www.foxonline.com/, ComponentLink2Description=Datasheet, ComponentLink2URL=http://www.foxonline.com/pdfs/hc49slf.pdf, DatasheetVersion=Mar-15, Elements=1, Height="6.1 mm", Length="6.6 mm", Mount="Through Hole", PackageDescription="2-Pin Through Hole Device, Body 11.35 x 4.65 mm, Pitch 4.88 mm", PackageReference=FOXSLF-2, Packaging=Rail/Tube, Pins=3, Radiation Hardening=No, Rds On Max="115 mohm", REACH SVHC="No SVHC", RoHSCompliant=true, Typical Rise Time="90 ns", Width="2.3 mm"

## Via types
v1: diameter 31.5, hole 15.75, Top Layer to Bottom Layer, tented both sides, 63 vias
v2: diameter 50, hole 28, Top Layer to Bottom Layer, 8 vias

## Nets (pads, with @x,y where several pads share a name; then routed paths per layer and width w, separated by ;. In a path a pad name is that pad's centre, name@x,y a point inside that pad or via, vN(x,y) a via of type N, cw(c..) or ccw(c..) an arc to the next point about the centre after c; other vN are vias at no path point)
+3V3: C4.1 C5.2 L1.2 R1.2 R21.2 R24.2 R44.2 R45.2 R54.1 R55.2 R56.2 R57.2 R61.2 TP1.1 TP19.1 U7.1 U7.7 | length 1621.5
  Top Layer w39.37: 1249.02,1516.73 1260.17,1505.58 1401.25,1505.58 1491.48,1595.81 ; v1(1500.49,1940.45) 1500.49,1672.74 1510.83,1662.4
  Bottom Layer w19.68: 1277.36,2481.1 1277.36,2227.56 1322.83,2182.09 1401.57,2182.09 1521.65,2182.09 1540.35,2163.39 1540.35,2016.46 1528.82,2004.93 1506.89,2004.93 1500.98,1999.02 1500.98,1990.16 1500.49,1989.67 ; 1277.36,2482.09 1277.36,2618.11 ; 1278.35,2482.09 1401.57,2482.09
  Bottom Layer w39.37: v1(1500.49,1940.45) 1500.49,1989.67
+3V3_MCU: C21.1 C34.2 C35.2 C36.2 C38.2 J1.1 L3.2 R35.2 TP28.1 U8.1 U8.24 U8.36 U8.48 | length 3813.8
  Top Layer w11.81: 852.36,1424.21 852.36,1512.8 ; v1(2136.81,1312.99) 2136.81,1356.3 2159.35,1378.84 2189.87,1378.84 2189.96,1378.94 2242.19,1378.94 2249.11,1385.86 2249.11,1540.35 ; 2249.02,1654.53 2249.11,1654.43 2249.11,1540.35 ; 2524.61,1595.47 2524.51,1595.38 2473.33,1595.38 2418.31,1540.35 2249.11,1540.35
  Top Layer w31.5: 905.51,1172.24 929.13,1148.62 1622.05,1148.62 1787.4,1313.98 1898.62,1313.98 v1(1899.61,1312.99) ; 922.24,1173.23 945.87,1149.61 947.83,1149.61
  Bottom Layer w19.68: 1625.15,558.07 1620.23,558.07 1617.28,555.12 1617.28,550.2 1608.27,541.19 1608.27,493.11 1663.39,493.11 1669.3,487.2
  Bottom Layer w31.5: 838.58,1227.36 v1(838.58,1363.19) ; 838.58,1236.21 838.58,1219.49 v1(866.14,1191.93) ; v1(1753.94,1278.54) 1753.94,2100.59 1932.09,2278.74 2093.71,2278.74 2095.48,2280.51 2104.34,2280.51 ; v1(1899.61,1312.99) 1900.59,1313.98 2135.83,1313.98 v1(2136.81,1312.99) 2137.8,1312.01 2203.73,1312.01
+3V3_REF: C22.1 C25.2 C37.2 L3.1 TP15.1 U4.1 U4.2 U8.9 | length 3322.3
  Top Layer w11.81: 845.47,311.02 847.44,312.99 ; 2066.92,1219.49 2178.15,1219.49 2248.92,1290.26 2248.92,1319.79 2249.02,1319.88 ; 2406.5,1319.88 2406.59,1319.98
  Top Layer w31.5: v2(265.75,927.17) 265.75,793.31 422.83,636.22 422.83,547.83 v2(419.29,544.29) ; v2(522.64,444.88) 524.61,442.91 605.31,442.91 648.62,399.61 648.62,311.02 ; 847.44,312.99 v2(847.44,499.02) ; 944.88,721.46 984.25,721.46 1007.87,745.08 1007.87,749.02 1271.65,1012.8 1696.85,1012.8 1902.56,1218.5 1997.03,1218.5 2075.79,1218.5
  Bottom Layer w31.5: v2@265.75,926.18 351.38,926.18 371.06,906.5 371.06,666.34 ; v2@420.28,544.29 419.29,543.31 419.29,466.53 428.15,466.53 449.8,444.88 v2(522.64,444.88) ; v2(847.44,499.02) 847.44,621.06 847.44,625 ; v2(851.38,721.46) 851.38,716.45 847.44,712.51 847.44,625 ; 949.8,625 847.44,625
+5: C1.2 C2.2 C9.2 P4.1 P5.1 U1.3 U2.5 U3.5 | length 7696.2
  Top Layer w39.37: 1021.65,154.33 1021.65,222.44 1100.39,301.18 1419.68,301.18 ; 1421.65,154.33 1421.65,301.18 2839.95,301.18 3007.07,468.31 3026.76,487.99 3204.72,665.96 3204.72,1276.57 3068.7,1412.6 3006.89,1412.6 3006.89,1552.95 3005.91,1553.94
  Bottom Layer w19.68: 2492.13,555.12 2494.37,555.12 2500.28,561.02 2500.28,588.86 2544.13,632.71 2633.04,632.71 2672.25,593.5 ; 2672.25,557.09 2672.25,593.5 ; 2690.94,1622.05 2827.75,1622.05 ; 2693.9,2303.15 2694.39,2302.66 2853.84,2302.66 2899.61,2256.89 3071.85,2256.89 3219.49,2109.25 3219.49,1703.74 3069.69,1553.94 3005.91,1553.94 2943.7,1616.14 2827.75,1616.14 ; 2827.75,1619.09 2833.66,1613.19 ; 3007.07,468.31 2840.54,634.84 2802.54,634.84 2802.38,634.68 2713.43,634.68 2672.25,593.5
  Bottom Layer w31.5: v2(234.25,1110.24) 234.25,1050.2 234.25,1026.57 138.78,931.1 138.78,760.83 214.57,685.04 277.56,685.04 280.51,682.09 280.51,666.34 280.51,557.08 278.55,555.12 256.89,555.12 218.5,516.73 218.5,429.13 248.03,399.61 340.55,399.61 585.83,154.33 1021.65,154.33
+5V: C29.2 C32.1 L4.2